# Altium PCB PolarizacionBJT.PcbDoc
Units mm, origin at the board's own origin, x right, y up, seen from the top; angles counter-clockwise.
Board outline 100 x 100 mm, 2 copper layers (Top Layer, Bottom Layer); 23 components, 11 nets, 49 pads, 4 vias.
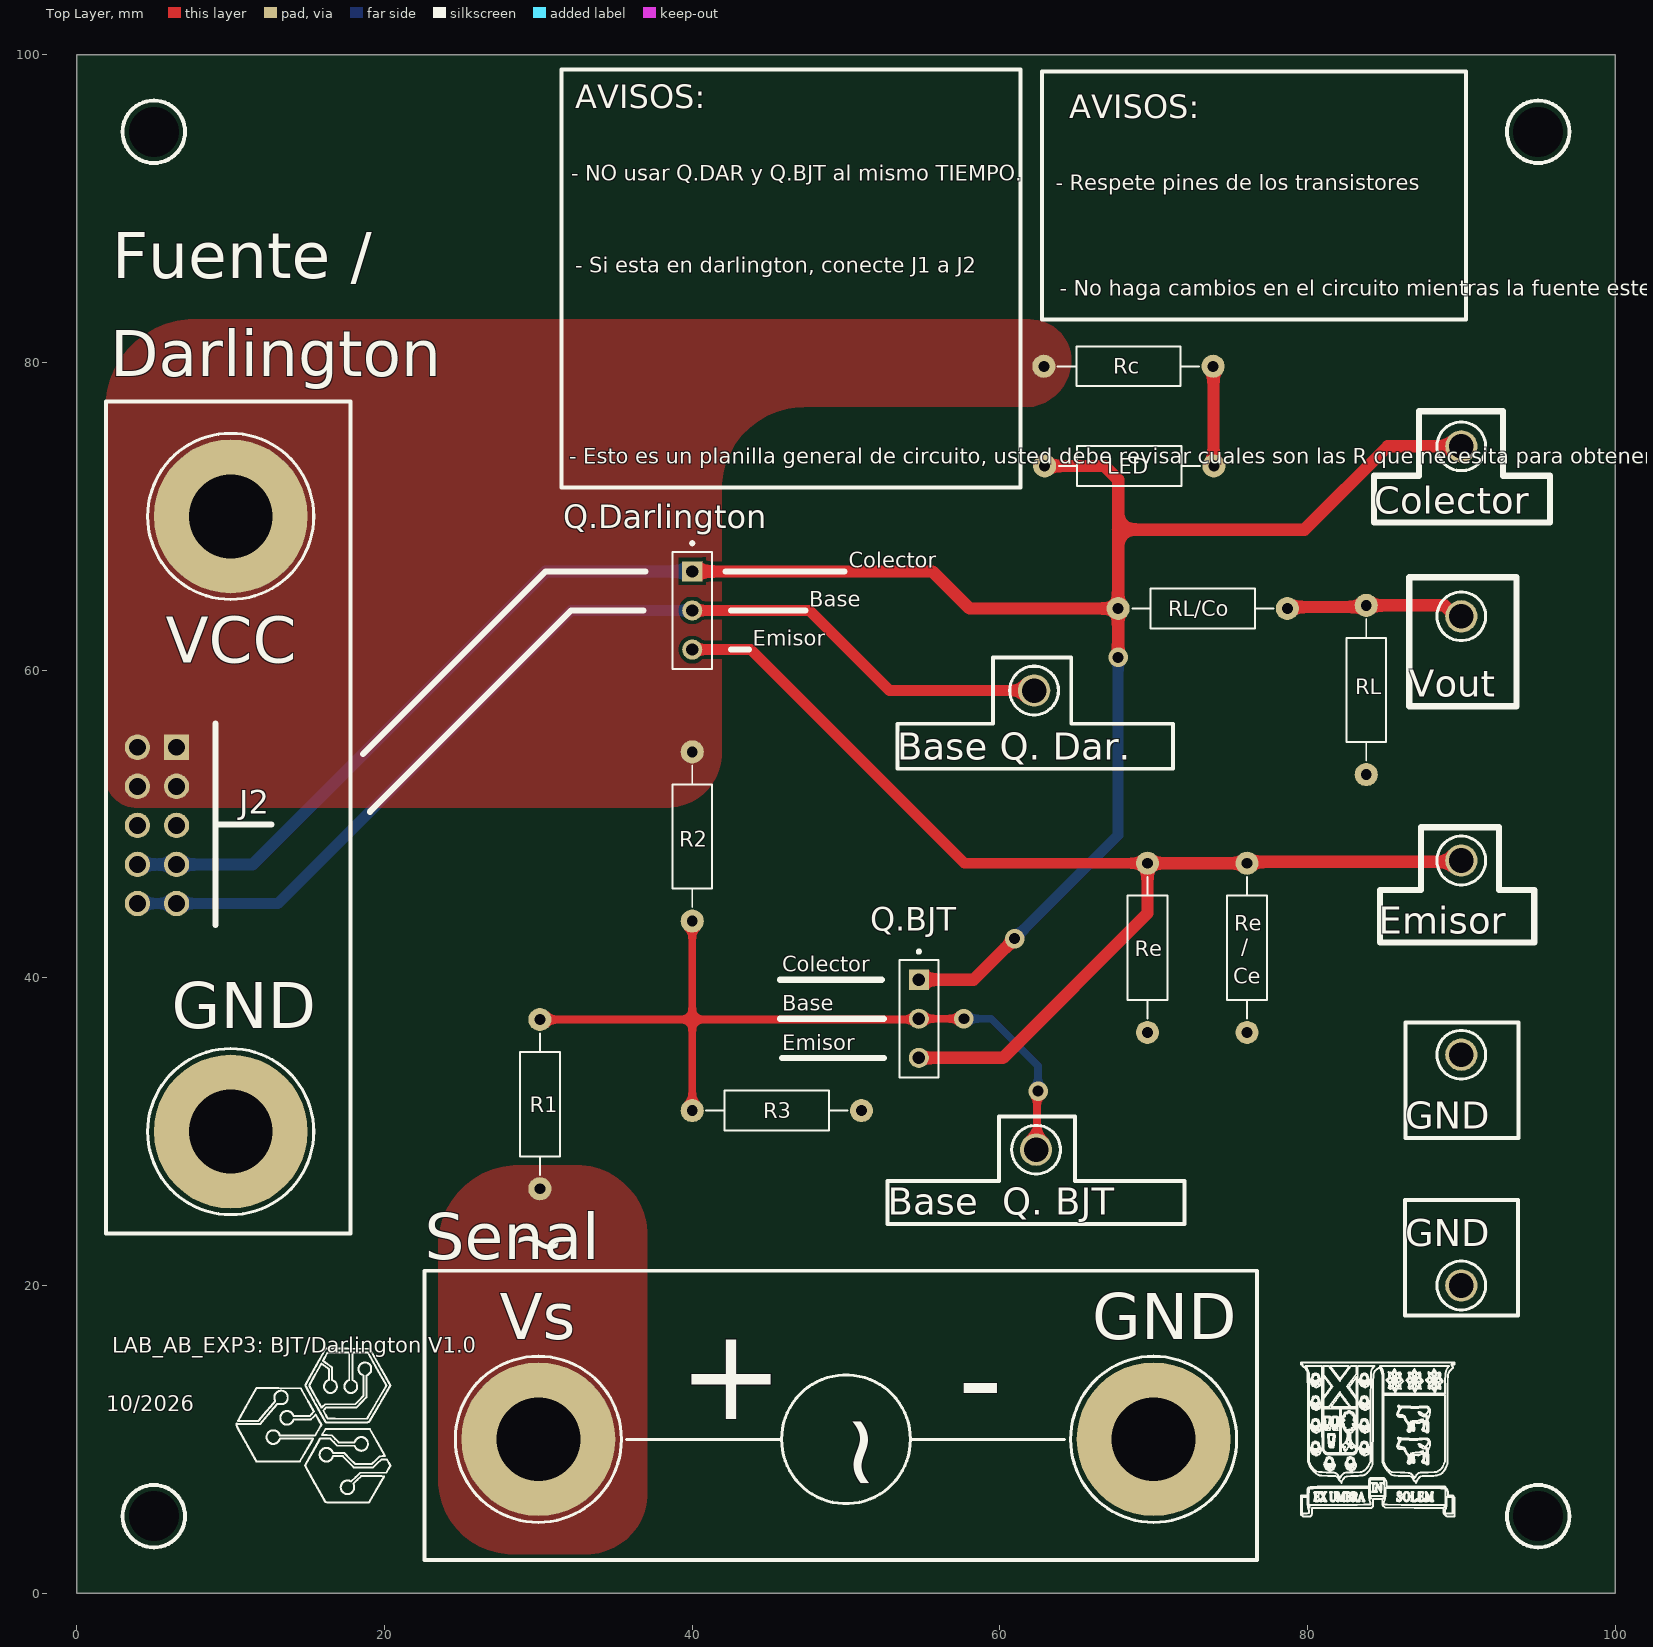
[diagram p0: Top Layer view]
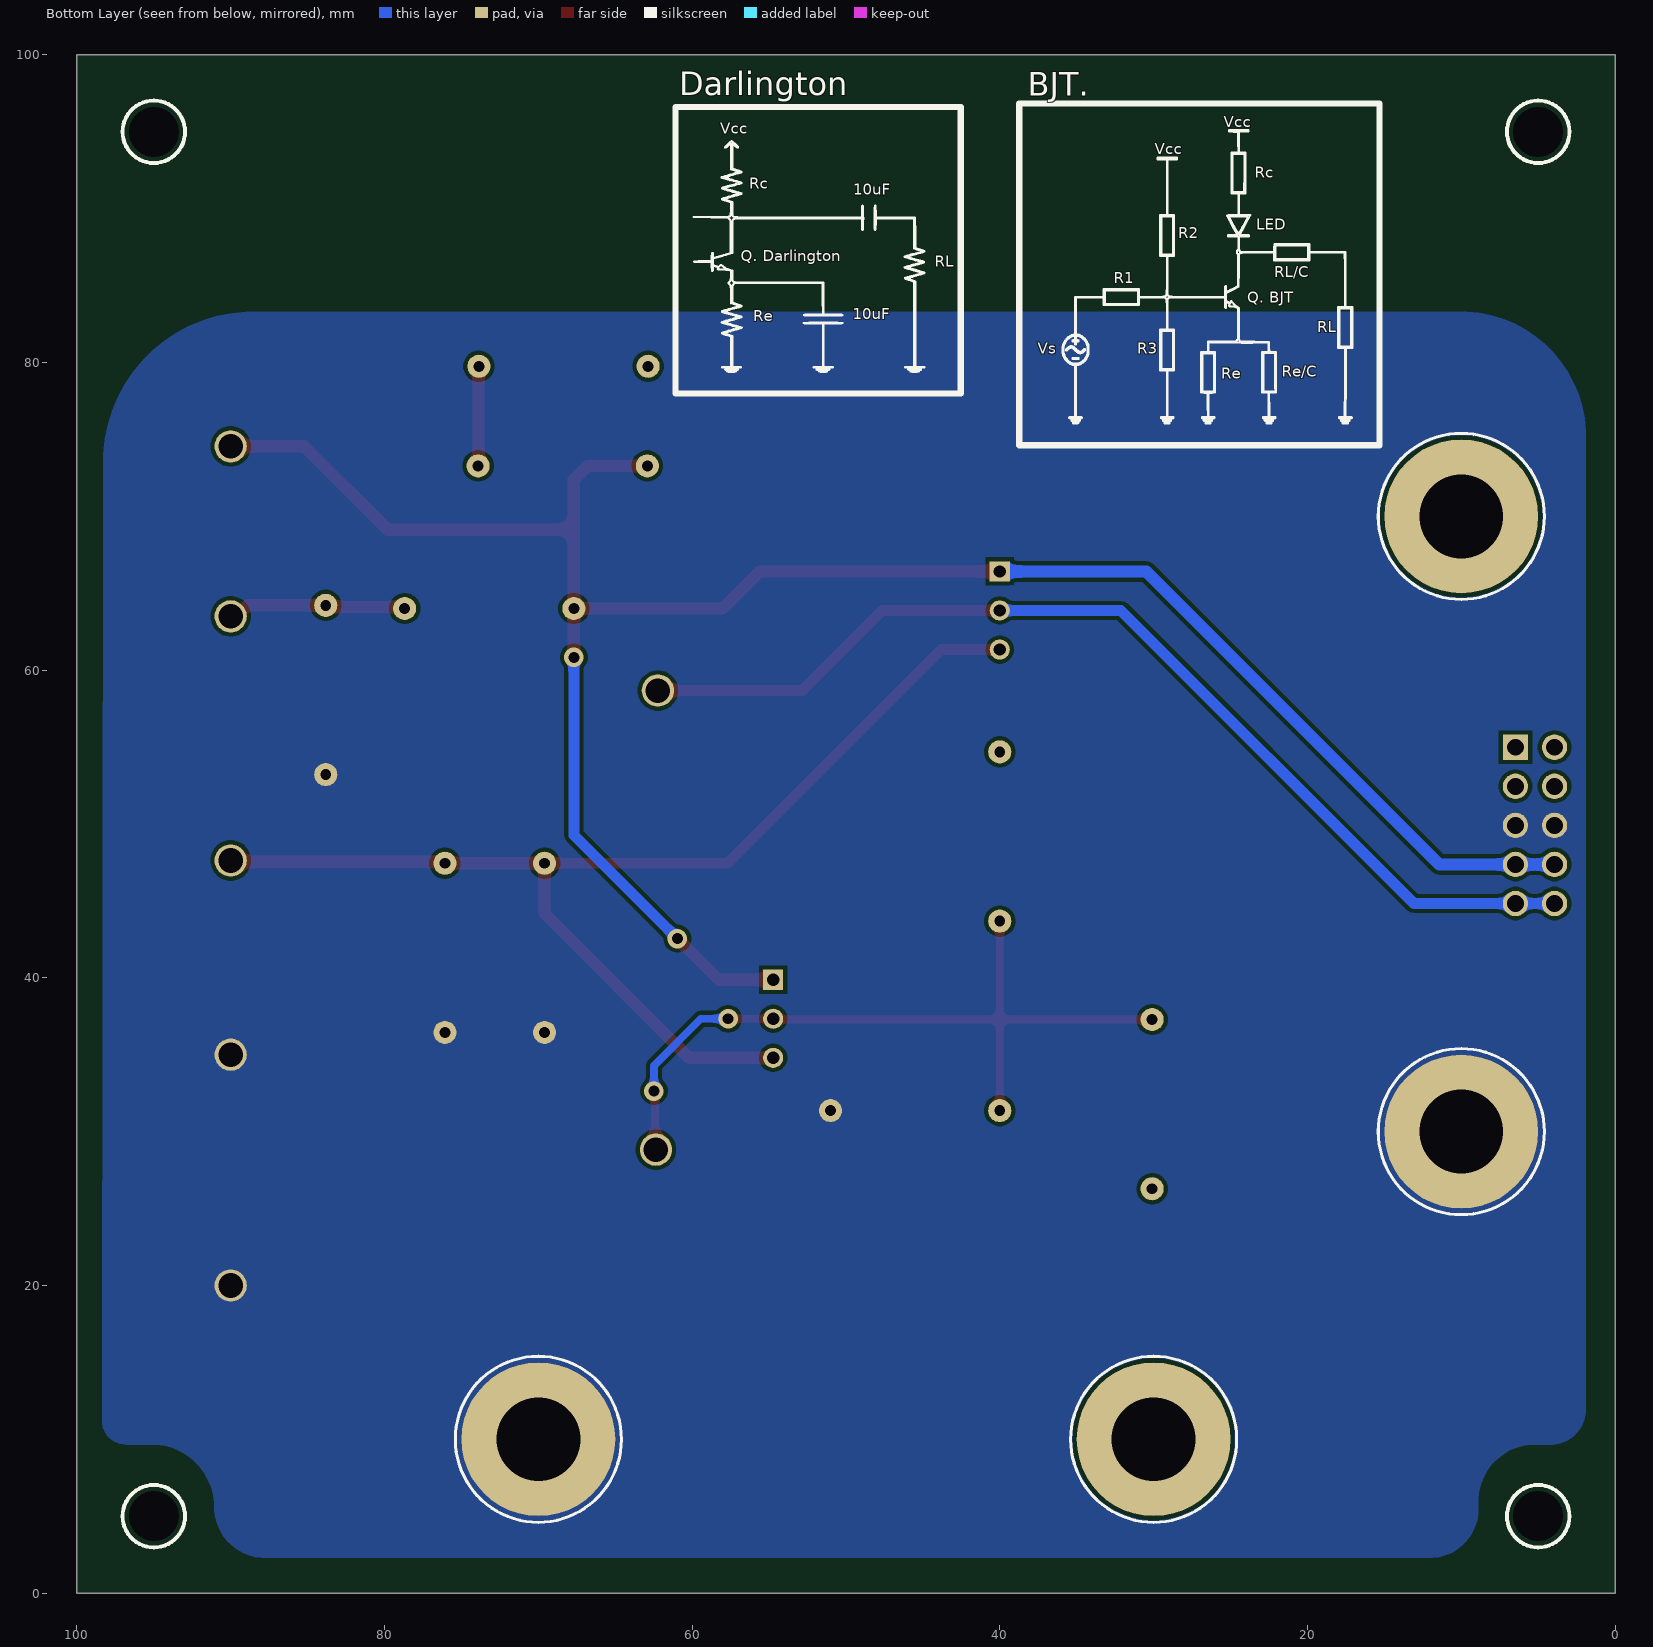
[diagram p1: Bottom Layer view, seen from below]

## Layer stack, top to bottom
Top Solder: solder mask 0.0102, Solder Resist, Dk 3.5
Top Layer: signal copper 0.0356
Dielectric 1: dielectric 0.32, FR-4, Dk 4.8
Bottom Layer: signal copper 0.0356
Bottom Solder: solder mask 0.0102, Solder Resist, Dk 3.5

## Board outline
0,0 0,100 100,100 100,0

## Design rules (kind name [scope] priority, off if disabled: settings)
Clearance [All] p1: gap=0.254 ignorepadtopadclearanceinfootprint=FALSE
HoleSize [All] p1: absolutevalues=TRUE maxlimit=7 minlimit=0.025 maxpercent=80.000 minpercent=20.000
PolygonConnect [All] p1: connectstyle=Direct reliefconductorwidth=0.254 reliefentries=4 polygonreliefangle="90 Angle" airgapwidth=0.254
RoutingVias [All] p1: holewidth=0.711 width=1.27 viastyle="Through Hole" minholewidth=0.711 minwidth=1.27 maxholewidth=0.711 maxwidth=1.27
SolderMaskExpansion [All] p1: expansion=0 istentingtop=FALSE
SupplyNets "Schematic Supply Nets_2" [InNet('GND')] p1: voltage=0.000
SupplyNets "Schematic Supply Nets_1" [InNet('VCC')] p2: voltage=0.000
SupplyNets "Schematic Supply Nets" [InNet('Vs')] p3: voltage=0.000
Width [All] p1: maxlimit=0.7 minlimit=0.254 preferedwidth=0.254
29 further rules are at their usual default settings.

## Components (designator, comment, footprint, x,y, rotation, side; value= is the part's Value field where it differs from the comment)
"Base  Q. BJT" "5012" KSTN-5012_V 62.357,28.829 r180 top (schematic designator TP10)
"Base Q. Dar." "5012" KSTN-5012_V 62.23,58.674 r180 top (schematic designator TP6)
Colector "5010" KSTN-5010_V 90,74.549 r90 top (schematic designator TP5)
Emisor "5014" KSTN-5014_V 90,47.625 r270 top (schematic designator TP7)
GND "5011" KSTN-5011_V 90,35 r90 top (schematic designator TP49)
GND "5011" KSTN-5011_V 90,20 r270 top (schematic designator TP9)
GND "575-4" KSTN-575-4 70,10 r0 top (schematic designator TP4)
GND "575-4" KSTN-575-4 10,30 r0 top locked (schematic designator TP2)
J2 "SSQ-105-02-T-D-RA" IDC_Hembra 6.477,54.991 r90 top locked (schematic designator J3)
LED "Zocalo_Resistencia_1/4W" Resistencia 73.914,73.279 r180 top (schematic designator R?)
Q.BJT "Zocalo_3pines" Zocalo_3pines 54.737,37.338 r90 top (schematic designator J1)
Q.Darlington "Zocalo_3pines" Zocalo_3pines 40.005,63.881 r90 top (schematic designator J2)
R1 "Zocalo_Resistencia_1/4W" Resistencia 30.099,26.289 r90 top (schematic designator R15)
R2 "Zocalo_Resistencia_1/4W" Resistencia 40.005,54.688 r270 top (schematic designator R14)
R3 "Zocalo_Resistencia_1/4W" Resistencia 40.005,31.369 r0 top (schematic designator R16)
Rc "Zocalo_Resistencia_1/4W" Resistencia 62.865,79.756 r0 top (schematic designator R7)
Re "Zocalo_Resistencia_1/4W" Resistencia 76.073,47.449 r270 top (schematic designator R12)
Re "Zocalo_Resistencia_1/4W" Resistencia 69.596,47.449 r270 top (schematic designator R8)
RL "Zocalo_Resistencia_1/4W" Resistencia 83.82,64.213 r270 top (schematic designator R13)
RL/Co "Zocalo_Resistencia_1/4W" Resistencia 78.691,64.008 r180 top (schematic designator R9)
VCC "575-4" KSTN-575-4 10,70 r0 top locked (schematic designator TP3)
Vout "5013" KSTN-5013_V 90,63.5 r270 top (schematic designator TP8)
Vs "575-4" KSTN-575-4 30,10 r0 top (schematic designator TP1)

## Footprints (in the part's own frame and the unit in brackets; to place one, negate y for a bottom-side part, rotate by r counter-clockwise, add the part's x,y. Pads: shape width x height; smd on the part's side, far side on the other; paste and mask are expansions set on the pad)
IDC_Hembra [mm]
  rect 1.65x1.65 / inner round 1.65 / far side rect 1.65x1.65 hole 1.1: 1(0,0)
  round 1.65 hole 1.1: 2(0,2.54) 3(-2.54,0) 4(-2.54,2.54) 5(-5.08,0) 6(-5.08,2.54) 7(-7.62,0) 8(-7.62,2.54) 9(-10.16,0) 10(-10.16,2.54)
  body extent -11.69,-0.33 1.53,12.56, height 4.95
KSTN-575-4 [mm] "Banana Jack, Non-Insulated, Dia 7.92mm"
  round 10 hole 5.45: 1(0,0)
  silkscreen extent -5.4,-5.4 5.4,5.4, body extent -3.98,-3.96 3.92,3.94, height 2.36
KSTN-5010_V [mm] "Test Point, Dia 3.17mm"
  round 2.1 hole 1.6: 1(0,0)
  silkscreen extent -1.58,-1.59 1.58,1.59, body extent -1.59,-1.59 1.59,1.59, height 8.13
KSTN-5011_V [mm] "Test Point, Dia 3.17mm"
  round 2.1 hole 1.6: 1(0,0)
  silkscreen extent -1.58,-1.59 1.58,1.59, body extent -1.59,-1.59 1.59,1.59, height 8.13
KSTN-5012_V [mm] "Test Point, Dia 3.17mm"
  round 2.1 hole 1.6: 1(0,0)
  silkscreen extent -1.59,-1.58 1.59,1.58, body extent -1.59,-1.59 1.59,1.59, height 8.13
KSTN-5013_V [mm] "Test Point, Dia 3.17mm"
  round 2.1 hole 1.6: 1(0,0)
  silkscreen extent -1.58,-1.59 1.58,1.59, body extent -1.59,-1.59 1.59,1.59, height 8.13
KSTN-5014_V [mm] "Test Point, Dia 3.17mm"
  round 2.1 hole 1.6: 1(0,0)
  silkscreen extent -1.58,-1.59 1.58,1.59, body extent -1.59,-1.59 1.59,1.59, height 8.13
Resistencia [mm]
  round 1.5 hole 0.711: 1(0,0) 2(11,0)
  silkscreen extent 0.89,-1.3 10.08,1.3, body extent -1.27,-1.27 12.27,1.27, height 6.39
Zocalo_3pines [mm]
  rect 1.308x1.308 / inner round 1.308 / far side rect 1.308x1.308 hole 0.8: 1(2.54,0)
  round 1.308 hole 0.8: 2(0,0) 3(-2.54,0)
  silkscreen extent -3.81,-1.27 4.47,1.27, body extent -3.81,-1.96 3.81,1.27, height 14

## Part data
"Base  Q. BJT" "Base Q. Dar.": library part CMP-1672-00004-4, "Test Point, White, Through Hole, RoHS, Bulk", Colour=White, Manufacturer=Keystone, Package Quantity=100, ComponentLink1Description="Manufacturer URL", ComponentLink1URL=http://www.keyelco.com/, ComponentLink2Description=Datasheet, ComponentLink2URL=http://www.keyelco.com/product-pdf.cfm?p=1321, Contact Material=Bronze, Contact Plating=Silver, DatasheetVersion="Rev. F, 12/2013", Height="8.12 mm", Length="11.3 mm", Mount="Through Hole", Mounting Technology="Through Hole", PackageDescription="1-Pin Through Hole Device, Dia 3.17 mm", PackageReference=5012, Packaging=Bulk, Pins=1, REACH SVHC="No SVHC", RoHSCompliant=true
Colector: library part CMP-1672-00002-4, "Test Point, Red, Through Hole, RoHS, Bulk", Colour=Red, Manufacturer=Keystone, Package Quantity=100, ComponentLink1Description="Manufacturer URL", ComponentLink1URL=http://www.keyelco.com/, ComponentLink2Description=Datasheet, ComponentLink2URL=http://www.keyelco.com/product-pdf.cfm?p=1319, Contact Material=Bronze, Contact Plating=Silver, DatasheetVersion="Rev. F, 12/2013", Height="8.12 mm", Mount="Through Hole", Mounting Technology="Through Hole", PackageDescription="1-Pin Through Hole Device, Dia 3.17 mm", PackageReference=5010, Packaging=Bulk, Pins=1, REACH SVHC="No SVHC", RoHSCompliant=true
Emisor: library part CMP-1672-00006-4, "Test Point, Yellow, Through Hole, RoHS, Bulk", Colour=Yellow, Manufacturer=Keystone, Package Quantity=100, ComponentLink1Description="Manufacturer URL", ComponentLink1URL=http://www.keyelco.com/, ComponentLink2Description=Datasheet, ComponentLink2URL=http://www.keyelco.com/product-pdf.cfm?p=1323, Contact Material=Bronze, Contact Plating=Silver, DatasheetVersion="Rev. F, 12/2013", Height="8.12 mm", Mount="Through Hole", Mounting Technology="Through Hole", PackageDescription="1-Pin Through Hole Device, Dia 3.17 mm", PackageReference=5014, Packaging=Bulk, REACH SVHC="No SVHC", RoHSCompliant=true
GND GND: library part CMP-1672-00003-4, "Test Point, Black, Through Hole, RoHS, Bulk", Colour=Black, Manufacturer=Keystone, Package Quantity=100, ComponentLink1Description="Manufacturer URL", ComponentLink1URL=http://www.keyelco.com/, ComponentLink2Description=Datasheet, ComponentLink2URL=http://www.keyelco.com/product-pdf.cfm?p=1320, Contact Material=Bronze, Contact Plating=Silver, DatasheetVersion="Rev. F, 12/2013", Height="8.12 mm", Mount="Through Hole", Mounting Technology="Through Hole", PackageDescription="1-Pin Through Hole Device, Dia 3.17 mm", PackageReference=5011, Packaging=Bulk, Pins=1, REACH SVHC="No SVHC", RoHSCompliant=true
GND GND VCC Vs: library part CMP-2000-05649-1, "Banana Jack, Non-Insulated, 1-Pin THD, RoHS, Bulk", Color=-, Manufacturer=Keystone-Electronics, Package Description="1-Pin Through Hole Device, Dia 7.92 mm", Package Version="Rev. B, 11/1994", Body Material=-, Category=Connectors,Interconnects, Contact Finish=Nickel, Contact Material=Brass, Datasheet URL=http://www.keyelco.com/product-pdf.cfm?p=2379, Datasheet Version="Rev. B, 11/1994", Family=BananaandTipConnectors-Jacks,Plugs, Features=-, Gender=Female, Insulation=Non-Insulated, Manufacturer URL=http://www.keyelco.com/, Mounting Technology=ThroughHole, Mounting Type=ThroughHole, Operating Temperature=-, Package Reference=575-4, Package URL=http://www.keyelco.com/product-pdf.cfm?p=2379, Packaging=Bulk, Plug/Mating Plug Diameter=StandardBanana, Series=-, Termination=Solder, Type=BananaJack, Wire Gauge=-
J2: library part IDC_Hembra, "CONN RECEPTACLE, 2.54MM, R/A DUAL 10WAY", Manufacturer_Name=SAMTEC, Mouser Part Number=200-SSQ10502TDRA, Datasheet Link=http://suddendocs.samtec.com/catalog_english/ssq_th.pdf, Geometry.Height=4.95mm, Manufacturer_Part_Number=SSQ-105-02-T-D-RA, Mouser Price/Stock=https://www.mouser.co.uk/ProductDetail/Samtec/SSQ-105-02-T-D-RA?qs=rU5fayqh%252BE3CzX1JlRzx2A%3D%3D
LED R1 R2 R3 Rc Re Re RL RL/Co: "1.07 kOhms Â±1% 0.25W, 1/4W Through Hole Resistor Axial - Metal Film", Package="RADIAL-2 YAGEO", Check_prices=https://www.snapeda.com/parts/MFR-25FBF52-1K/Yageo/view-part/?ref=eda, MF=Yageo, MP=MFR-25FBF52-1K, SnapEDA_Link=https://www.snapeda.com/parts/MFR-25FBF52-1K/Yageo/view-part/?ref=snap
Q.BJT Q.Darlington: Package=None, Availability=Unavailable, MP=D01-9970342, Price=None
Vout: library part CMP-1672-00005-4, "Test Point, Orange, Through Hole, RoHS, Bulk", Colour=Orange, Manufacturer=Keystone, Package Quantity=100, ComponentLink1Description="Manufacturer URL", ComponentLink1URL=http://www.keyelco.com/, ComponentLink2Description=Datasheet, ComponentLink2URL=http://www.keyelco.com/product-pdf.cfm?p=1322, Contact Material=Bronze, Contact Plating=Silver, DatasheetVersion="Rev. F, 12/2013", Height="8.12 mm", Mount="Through Hole", Mounting Technology="Through Hole", PackageDescription="1-Pin Through Hole Device, Dia 3.17 mm", PackageReference=5013, Packaging=Bulk, REACH SVHC="No SVHC", RoHSCompliant=True

## Free pads (board coordinates)
  round 0 hole 3.25: 10(5,5) 10(5,95) 10(95,5) 10(95,95)

## Via types
v1: diameter 1.27, hole 0.711, Top Layer to Bottom Layer, 4 vias

## Nets (pads, with @x,y where several pads share a name; then routed paths per layer and width w, separated by ;. In a path a pad name is that pad's centre, name@x,y a point inside that pad or via, vN(x,y) a via of type N, cw(c..) or ccw(c..) an arc to the next point about the centre after c; other vN are vias at no path point)
Base: "Base Q. Dar..1"
Base_BJT: "Base  Q. BJT.1" Q.BJT.2 R1.2 R3.1 | length 51.5
  Top Layer w0.5: R1.2 40.005,37.289 ; R3.1 40.005,37.289 ; 40.005,43.688 40.005,37.289 ; Q.BJT.2@54.737,37.289 40.005,37.289 ; Q.BJT.2 v1(57.658,37.338) ; 62.357,28.829 62.42,28.892 62.42,32.575 v1(62.484,32.639)
  Bottom Layer w0.5: v1(57.658,37.338) 59.436,37.338 62.484,34.29 v1(62.484,32.639)
Base_Dar: J2.9 J2.10 Q.Darlington.2 | length 68.3
  Top Layer w0.7: Q.Darlington.2 47.625,63.881 52.832,58.674 62.23,58.674
  Bottom Layer w0.7: J2.10 J2.9 13.081,44.831 32.131,63.881 Q.Darlington.2
Colector: R2.2
Emisor: Emisor.1 Q.BJT.3 Q.Darlington.3 Re.1 | length 77.8
  Top Layer w0.7: Q.Darlington.3 43.815,61.341 57.707,47.449 Re.1@69.596,47.449 ; Re.1@76.073,47.449 Re.1@76.161,47.537 ; Emisor.1@89.912,47.537 Emisor.1
  Top Layer w0.8: Q.BJT.3 60.198,34.798 69.596,44.196 69.596,47.449 Re.1@76.073,47.449 ; Re.1@76.161,47.537 Emisor.1@89.912,47.537
GND: GND.1 J2.5 J2.6 R3.2 Re.2 RL.2
Load: RL.1 RL/Co.1 Vout.1 | length 11.5
  Top Layer w0.5: RL/Co.1 RL/Co.1@78.793,64.11
  Top Layer w0.7: Vout.1@89.621,63.5 Vout.1
  Top Layer w0.8: RL/Co.1@78.793,64.11 RL.1@83.718,64.11 ; RL.1 88.908,64.213 Vout.1@89.621,63.5
Post-colector: Colector.1 J2.7 J2.8 LED.2 Q.BJT.1 Q.Darlington.1 RL/Co.2 | length 142.3
  Top Layer w0.8: Q.Darlington.1 55.626,66.421 58.039,64.008 RL/Co.2 ; Q.BJT.1 58.293,39.878 v1(60.96,42.545) ; LED.2 66.802,73.279 67.691,72.39 67.691,69.137 ; v1(67.691,60.833) RL/Co.2 ; Colector.1 85.217,74.549 79.805,69.137 67.691,69.137 ; RL/Co.2 67.691,69.137
  Bottom Layer w0.7: v1(60.96,42.545) 67.691,49.276 v1(67.691,60.833)
  Bottom Layer w0.8: J2.8 J2.7 11.43,47.371 30.48,66.421 Q.Darlington.1
Pre-colector: LED.1 Rc.2 | length 6.5
  Top Layer w0.7: Rc.2 Rc.2@73.889,79.731 ; LED.1@73.889,73.304 LED.1
  Top Layer w0.8: LED.1@73.889,73.304 Rc.2@73.889,79.731
VCC: J2.1 J2.2 J2.3 J2.4 R2.1 Rc.1 VCC.1
Vs: R1.1 Vs.1 | length 0.1
  Top Layer w1: Vs.1 Vs.1@30.099,10.099
copper on no net: | length 23.9
  Bottom Layer w0.4: 18.796,54.737 30.48,66.421 37.846,66.421

## Polygon pours and split planes (outlines as drawn)
Vs on Top Layer "VS_L01_P011" (solid, pour order 11): 28.702,27.813 32.512,27.813 cw(c32.512,23.241) 37.084,23.241 37.084,6.477 cw(c33.147,6.477) 33.147,2.54 28.321,2.54 cw(c28.321,7.366) 23.495,7.366 23.495,22.606 cw(c28.702,22.606)
VCC on Top Layer "VCC_L01_P010" (solid, pour order 10): 3.933,51.054 38.354,51.054 ccw(c38.354,54.61) 41.91,54.61 41.91,71.755 cw(c47.244,71.755) 47.244,77.089 61.595,77.089 ccw(c61.595,80.137) 64.643,80.137 ccw(c61.976,80.137) 61.976,82.804 7.631,82.804 ccw(c7.631,77.055) 1.882,77.078 1.787,53.209 ccw(c3.933,53.2)
GND on Bottom Layer "GND_L02_P002" (solid, pour order 2): 10.033,83.312 88.51,83.312 cw(c88.51,73.551) 98.272,73.566 98.367,11.246 cw(c96.776,11.243) 96.776,9.652 95.123,9.652 ccw(c95.123,5.588) 91.059,5.588 cw(c87.757,5.588) 87.757,2.286 12.065,2.286 cw(c12.065,5.461) 8.89,5.461 8.89,5.969 ccw(c5.207,5.969) 5.207,9.652 4.191,9.652 cw(c4.191,11.938) 1.905,11.938 1.905,75.184 cw(c10.033,75.184)

## Silkscreen, mask and mechanical layers (free items; w line width, h text height)
Top Overlay:
  drawing of 24994 lines, arcs and shapes, not listed
  text "AVISOS:" at 32.385,96.52 h1.52
  text "AVISOS:" at 64.516,95.885 h1.52
  text "- NO usar Q.DAR y Q.BJT al mismo TIEMPO." at 32.131,91.821 h1
  text "- Respete pines de los transistores" at 63.627,91.186 h1
  text "- Si esta en darlington, conecte J1 a J2" at 32.385,85.852 h1
  text "Fuente /" at 2.286,85.471 h3
  text "- No haga cambios en el circuito mientras la fuente este conectada" at 63.881,84.328 h1
  text "Darlington" at 2.159,79.105 h3
  text "- Esto es un planilla general de circuito, usted debe revisar cuales son las R que necesita para obtener las mediciones que se le exigen" at 32.004,73.406 h1
  text "Colector" at 50.165,66.675 h1
  text "Base" at 47.625,64.135 h1
  text "Emisor" at 43.942,61.595 h1
  text "/" at 75.692,41.529 h1
  text "Colector" at 45.847,40.386 h1
  text "Ce" at 75.184,39.624 h1
  text "Base" at 45.847,37.846 h1
  text "Emisor" at 45.847,35.306 h1
  text "~" at 28.044,21.888 h3 r346.5
  text "Senal" at 22.606,21.701 h3
  text "LAB_AB_EXP3: BJT/Darlington V1.0" at 2.286,15.621 h1
  text "10/2026" at 1.905,11.811 h1
  text "~" at 47.448,11.811 h8 r270
  text "+" at 39.108,11.311 h6
  text "-" at 57.269,11.09 h6
Bottom Overlay:
  drawing of 2991 lines, arcs and shapes, not listed
  text "Darlington" at 60.833,97.385 h1.52
  text "BJT." at 38.171,97.351 h1.52
  text "Vcc" at 25.453,95.3 h0.7
  text "Vcc" at 58.176,94.881 h0.7
  text "Vcc" at 29.916,93.541 h0.7
  text "Rc" at 23.439,92.017 h0.7
  text "Rc" at 56.297,91.313 h0.7
  text "10uF" at 49.535,90.921 h0.7
  text "LED" at 23.346,88.621 h0.7
  text "R2" at 28.392,88.08 h0.7
  text "Q. Darlington" at 56.85,86.592 h0.7
  text "RL" at 44.232,86.233 h0.7
  text "RL/C" at 22.169,85.54 h0.7
  text "R1" at 32.583,85.159 h0.7
  text "Q. BJT" at 23.908,83.876 h0.7
  text "10uF" at 49.566,82.804 h0.7
  text "Re" at 56.043,82.677 h0.7
  text "RL" at 19.375,81.984 h0.7
  text "R3" at 31.059,80.587 h0.7
  text "Vs" at 37.536,80.587 h0.7
  text "Re/C" at 21.661,79.063 h0.7
  text "Re" at 25.598,78.936 h0.7
Mechanical 1:
  lines w0.254: 100,0 100,0.102